# Altium PCB DSP大板子.PcbDoc (part 9 of 9)
Units mil, origin at the board's own origin, x right, y up, seen from the top; angles counter-clockwise.
Board outline 7874.02 x 9055.12 mil, 4 copper layers (Top Layer, GND02, PWR03, Bottom Layer), stack 23.756 mil thick; 656 components, 360 nets, 1967 pads, 2623 vias.
Unrouted connection lines stored in the file: 70.
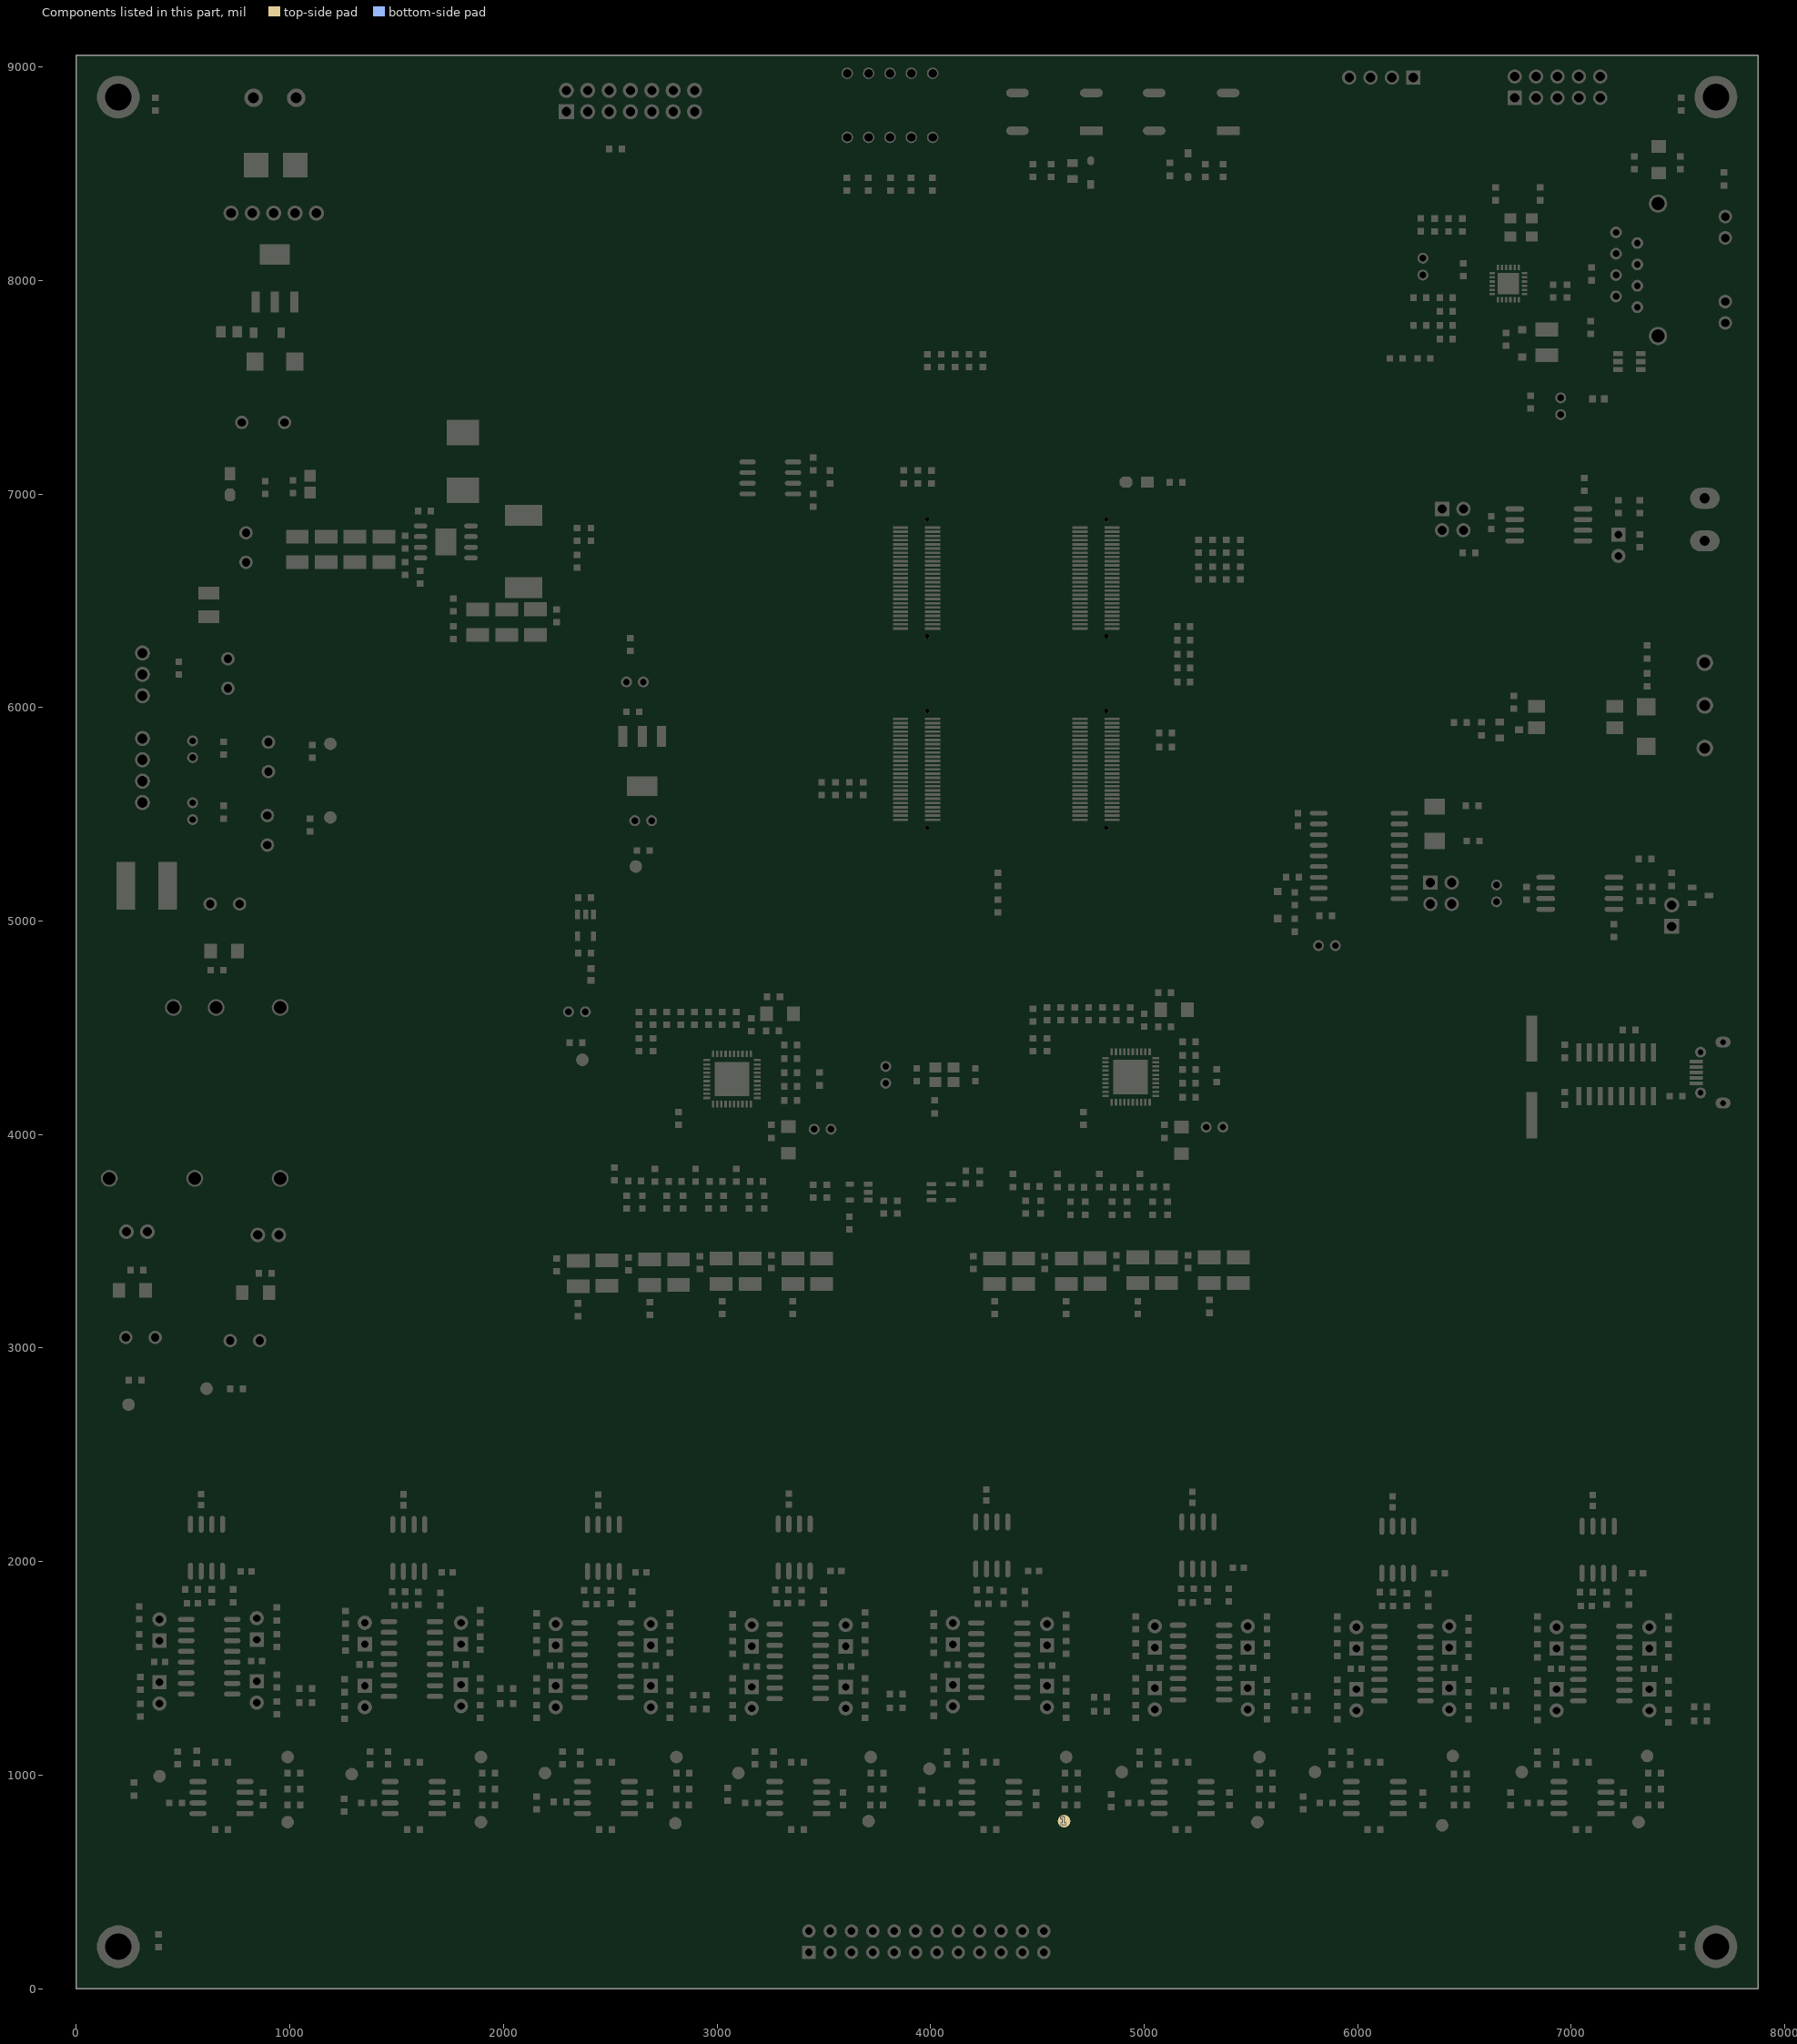
[diagram p8: the components of this part, seen from the top]

## Polygon pours and split planes (outlines as drawn) (continued)
IOVDD on PWR03 (split plane): 7853.92,8555.07 7145,8555.07 7142.06,8554.78 7139.23,8553.93 7136.63,8552.53 7134.34,8550.66 7132.47,8548.37 7131.07,8545.77 7130.22,8542.94 7129.93,8540 7129.93,7680 7130.22,7677.06 7131.07,7674.23 7132.47,7671.63 7134.34,7669.34 7136.63,7667.47 7139.23,7666.07 7142.06,7665.22 7145,7664.93 7853.92,7664.93 7853.92,3935.07 5751.24,3935.07 5285.66,4400.66 5283.37,4402.53 5280.77,4403.93 5277.94,4404.78 5275,4405.07 5271.24,4405.07 5270.66,4405.66 5268.37,4407.53 5265.77,4408.93 5262.94,4409.78 5260,4410.07 2050.07,4410.07 2050.07,5830 2049.78,5832.94 2048.93,5835.77 2047.53,5838.37 2045.66,5840.66 1590.66,6295.66 1588.37,6297.53 1585.77,6298.93 1582.94,6299.78 1580,6300.07 1380.07,6300.07 1380.07,6740 1379.78,6742.94 1378.93,6745.77 1377.53,6748.37 1375.66,6750.66 1210.07,6916.24 1210.07,9035.02 7853.92,9035.02
no net on PWR03 (split plane): 7853.92,7695.07 7160.07,7695.07 7160.07,8524.93 7853.92,8524.93
+5V_SYS on PWR03 (split plane): 7444.93,7143.76 7444.93,5861.24 6964.34,5380.66 6962.47,5378.37 6961.07,5375.77 6960.22,5372.94 6959.93,5370 6959.93,5076.24 6433.76,4550.07 5681.24,4550.07 4319.59,5911.72 4317.31,5913.6 4314.7,5914.99 4311.88,5915.85 4308.94,5916.14 2881.06,5916.14 2878.12,5915.85 2875.3,5914.99 2872.69,5913.6 2870.41,5911.72 2559.34,5600.66 2557.47,5598.37 2556.07,5595.77 2555.22,5592.94 2554.93,5590 2554.93,5015.07 2320.07,5015.07 2320.07,6650 2320.07,6763.76 2441.24,6884.93 2763.76,6884.93 2769.34,6879.34 2771.63,6877.47 2774.23,6876.07 2777.06,6875.22 2780,6874.93 3853.76,6874.93 5459.93,5268.76 5459.93,5145 5460.22,5142.06 5461.07,5139.23 5462.47,5136.63 5464.34,5134.34 5784.34,4814.34 5786.63,4812.47 5789.23,4811.07 5792.06,4810.22 5795,4809.93 6115,4809.93 6117.94,4810.22 6120.77,4811.07 6123.37,4812.47 6125.66,4814.34 6260.66,4949.34 6262.53,4951.63 6263.93,4954.23 6264.78,4957.06 6265.07,4960 6265.07,5263.76 7155.66,6154.34 7157.53,6156.63 7158.93,6159.23 7159.78,6162.06 7160.07,6165 7160.07,7073.76 7236.24,7149.93 7438.76,7149.93
VBIAS_1V5 on PWR03 (split plane): 485 vertices, not listed, extent 600.07,1190.07 7853.92,3724.93
AVDD on PWR03 (split plane): 5249.34,4379.34 5251.63,4377.47 5254.23,4376.07 5257.06,4375.22 5258.62,4375.06 5269.34,4364.34 5271.63,4362.47 5274.23,4361.07 5277.06,4360.22 5280,4359.93 5282.94,4360.22 5283.34,4360.34 5734.34,3909.34 5736.63,3907.47 5739.23,3906.07 5742.06,3905.22 5745,3904.93 7853.92,3904.93 7853.92,3465.07 5716.24,3465.07 5430.66,3750.66 5428.37,3752.53 5425.77,3753.93 5422.94,3754.78 5420,3755.07 2050.07,3755.07 2050.07,4379.93 5248.86,4379.93
-12V on PWR03 (split plane): 350 vertices, not listed, extent 470.07,1460.07 7604.93,6269.93
+12V on PWR03 (split plane): 243 vertices, not listed, extent 425.07,1010.07 7853.92,5969.93
+24V_SYS on PWR03 (split plane): 710,9034.93 1179.93,9034.93 1179.93,6910 1180.22,6907.06 1181.07,6904.23 1182.47,6901.63 1184.34,6899.34 1349.93,6733.76 1349.93,6300.07 635,6300.07 632.06,6299.78 629.23,6298.93 626.63,6297.53 624.34,6295.66 444.34,6115.66 442.47,6113.37 441.07,6110.77 440.22,6107.94 439.93,6105 439.93,5455 440.22,5452.06 441.07,5449.23 442.47,5446.63 444.34,5444.34 584.34,5304.34 586.63,5302.47 589.23,5301.07 592.06,5300.22 595,5299.93 1309.93,5299.93 1309.93,4720 1309.93,4685.07 20.1,4685.07 20.1,9035.02 709.05,9035.02
-15V on PWR03 (split plane): 1314.93,4100 1314.93,3725.07 940,3725.07 937.06,3724.78 934.23,3723.93 931.63,3722.53 929.34,3720.66 399.34,3190.66 397.47,3188.37 396.07,3185.77 395.22,3182.94 394.93,3180 394.93,1040 395.22,1037.06 396.07,1034.23 397.47,1031.63 399.34,1029.34 444.34,984.34 446.63,982.47 449.23,981.07 452.06,980.22 455,979.93 7853.92,979.93 7853.92,20.1 4300.07,20.1 4300.07,344.93 7240,344.93 7242.94,345.22 7245.77,346.07 7248.37,347.47 7250.66,349.34 7255.66,354.34 7257.53,356.63 7258.93,359.23 7259.78,362.06 7260.07,365 7260.07,770 7259.78,772.94 7258.93,775.77 7257.53,778.37 7255.66,780.66 7250.66,785.66 7248.37,787.53 7245.77,788.93 7242.94,789.78 7240,790.07 321.24,790.07 210.07,901.24 210.07,3758.76 626.24,4174.93 1314.93,4174.93
+15V on PWR03 (split plane): 1314.93,4347.5 1314.93,4205.07 620,4205.07 617.06,4204.78 614.23,4203.93 611.63,4202.53 609.34,4200.66 184.34,3775.66 182.47,3773.37 181.07,3770.77 180.22,3767.94 179.93,3765 179.93,895 180.22,892.06 181.07,889.23 182.47,886.63 184.34,884.34 304.34,764.34 306.63,762.47 309.23,761.07 312.06,760.22 315,759.93 7229.93,759.93 7229.93,375.07 4285,375.07 4282.06,374.78 4279.23,373.93 4276.63,372.53 4274.34,370.66 4272.47,368.37 4271.07,365.77 4270.22,362.94 4269.93,360 4269.93,20.1 20.1,20.1 20.1,4654.93 1314.93,4654.93
no net on GND02 (split plane): 7853.92,7695.07 7160.07,7695.07 7160.07,8524.93 7853.92,8524.93
PULSE_24V_GND on GND02 (split plane): 7853.92,5650.07 7201.24,5650.07 7115.07,5736.24 7115.07,6333.76 7231.24,6449.93 7853.92,6449.93
no net on GND02 (split plane): 7853.92,6480.07 7225,6480.07 7222.06,6479.78 7219.23,6478.93 7216.63,6477.53 7214.34,6475.66 7089.34,6350.66 7087.47,6348.37 7086.07,6345.77 7085.22,6342.94 7084.93,6340 7084.93,5730 7085.22,5727.06 7086.07,5724.23 7087.47,5721.63 7089.34,5719.34 7184.34,5624.34 7186.63,5622.47 7189.23,5621.07 7192.06,5620.22 7195,5619.93 7853.92,5619.93 7853.92,5485.07 7026.24,5485.07 6940.07,5571.24 6940.07,6413.76 6975.66,6449.34 7096.24,6569.93 7853.92,6569.93
GND on GND02 (split plane): 7853.92,8555.07 7145,8555.07 7142.06,8554.78 7139.23,8553.93 7136.63,8552.53 7134.34,8550.66 7132.47,8548.37 7131.07,8545.77 7130.22,8542.94 7129.93,8540 7129.93,7680 7130.22,7677.06 7131.07,7674.23 7132.47,7671.63 7134.34,7669.34 7136.63,7667.47 7139.23,7666.07 7142.06,7665.22 7145,7664.93 7853.92,7664.93 7853.92,6600.07 7090,6600.07 7087.06,6599.78 7084.23,6598.93 7081.63,6597.53 7079.34,6595.66 6954.34,6470.66 6914.34,6430.66 6912.47,6428.37 6911.07,6425.77 6910.22,6422.94 6909.93,6420 6909.93,5565 6910.22,5562.06 6911.07,5559.23 6912.47,5556.63 6914.34,5554.34 7009.34,5459.34 7011.63,5457.47 7014.23,5456.07 7017.06,5455.22 7020,5454.93 7853.92,5454.93 7853.92,20.1 20.1,20.1 20.1,9035.02 7853.92,9035.02

## Other copper
Top Layer:
  pour cut-out: 7145,8540 7805,8540 7874.02,8540 7874.02,7680 7805,7680 7145,7680
  pour cut-out: 3440,895 3440,850 3450,840 3545,840 3565,820 3750,820 3750,885 3735,900 3445,900
  pour cut-out: 1640,895 1640,845 1645,840 1740,840 1760,820 1920,820 1935,835 1935,895
  pour cut-out: 740,895 740,845 827.46,845 847.46,825 1025,825 1025,875 1005,895
  pour cut-out: 7070,2000 7119.99,2000 7120.23,2000.25 7125.12,2000.25 7125.12,1891.61 7134.49,1882.24 7134.49,1769.8 7073.59,1769.8 7070,1773.39
  pour cut-out: 7101.91,895 7101.91,853.09 7115,840 7210.3,840 7225.3,825 7385,825 7385,895
  pour cut-out: 6135,2000 6189.58,2000 6189.69,2000.11 6191.1,1998.7 6191.1,1767.33 6142.67,1767.33 6135,1775
  pour cut-out: 6140,895 6140,845 6245,845 6260,830 6475,830 6475,895
  pour cut-out: 5200,2020 5200.13,2019.87 5254.38,2019.87 5254.38,1905.39 5260.74,1899.03 5260.74,1779.34 5205.66,1779.34 5197.52,1787.48 5197.52,2017.52
  pour cut-out: 5230,895 5230,850 5235,845 5350,845 5375,820 5555,820 5570,835 5570,895
  pour cut-out: 4235,2020 4290,2020 4295,2015 4295,1905.22 4304.97,1895.24 4304.97,1774.97 4245.03,1774.97 4240,1780 4240,1910 4235,1915
  pour cut-out: 4340,895 4340,845 4450,845 4470,825 4650,825 4665,840 4665,890 4660,895
  pour cut-out: 3305,2010 3370,2010 3370,1794.4 3355,1779.4 3354.4,1780 3310,1780 3305,1785
  pour cut-out: 2415,2005 2470,2005 2475.88,1999.12 2475.88,1776.59 2416.59,1776.59 2415,1775 2410,1780 2410,2000
  pour cut-out: 2540,895 2540,845 2545,840 2650,840 2675,815 2830,815 2830,895
  pour cut-out: 1505,2010 1505.1,2009.91 1561.67,2009.91 1561.67,1893.36 1568.56,1886.48 1568.56,1766.83 1513.17,1766.83 1505,1775
  pour cut-out: 1640,895 1640,845 1645,840 1740,840 1760,820 1920,820 1935,835 1935,895
  pour cut-out: 560,2010 615,2010 620,2005 620,1910.12 607.44,1897.56 607.44,1782.6 547.4,1782.6 540,1790 540,1900 560,1920
  pour cut-out: 6910,6580 7875,6580 7875,5475 6910,5475
Bottom Layer:
  pour cut-out: 7145,8540 7805,8540 7874.02,8540 7874.02,7680 7805,7680 7145,7680
  pour cut-out: 2540,895 2540,845 2545,840 2650,840 2675,815 2830,815 2830,895
  pour cut-out: 3440,895 3440,850 3450,840 3545,840 3565,820 3750,820 3750,885 3735,900 3445,900
  pour cut-out: 4340,895 4340,845 4450,845 4470,825 4650,825 4665,840 4665,890 4660,895
  pour cut-out: 5230,895 5230,850 5235,845 5350,845 5375,820 5555,820 5570,835 5570,895
  pour cut-out: 6140,895 6140,845 6245,845 6260,830 6475,830 6475,895
  pour cut-out: 7101.91,895 7101.91,853.09 7115,840 7210.3,840 7225.3,825 7385,825 7385,895
  pour cut-out: 7070,2000 7119.99,2000 7120.23,2000.25 7125.12,2000.25 7125.12,1891.61 7134.49,1882.24 7134.49,1769.8 7073.59,1769.8 7070,1773.39
  pour cut-out: 6134.84,1999.84 6189.42,1999.84 6189.53,1999.95 6190.94,1998.54 6190.94,1767.17 6142.51,1767.17 6134.84,1774.84
  pour cut-out: 5200,2020 5200.13,2019.87 5254.38,2019.87 5254.38,1905.39 5260.74,1899.03 5260.74,1779.34 5205.66,1779.34 5197.52,1787.48 5197.52,2017.52
  pour cut-out: 4235,2019.73 4290,2019.73 4295,2014.73 4295,1904.94 4304.97,1894.97 4304.97,1774.7 4245.03,1774.7 4240,1779.73 4240,1909.73 4235,1914.73
  pour cut-out: 3305,2010 3370,2010 3370,1794.4 3355,1779.4 3354.4,1780 3310,1780 3305,1785
  pour cut-out: 2415,2005 2470,2005 2475.88,1999.12 2475.88,1776.59 2416.59,1776.59 2415,1775 2410,1780 2410,2000
  pour cut-out: 1505,2010 1505.1,2009.91 1561.67,2009.91 1561.67,1893.36 1568.56,1886.48 1568.56,1766.83 1513.17,1766.83 1505,1775
  pour cut-out: 1641.04,894.65 1641.04,844.65 1646.04,839.65 1741.04,839.65 1761.04,819.65 1921.04,819.65 1936.04,834.65 1936.04,894.65
  pour cut-out: 560,2010 615,2010 620,2005 620,1910.12 607.44,1897.56 607.44,1782.6 547.4,1782.6 540,1790 540,1900 560,1920
  pour cut-out: 740,895 740,845 827.46,845 847.46,825 1025,825 1025,875 1005,895
  pour cut-out: 6910,6580 6910,5475 7875,5475 7875,6580
GND02 (plane layer: these items are gaps in the copper):
  lines w30: 7870,5470 7020,5470 6925,5565 6925,6420 6965,6460 7090,6585 7875,6585 ; 7874.02,7680 7145,7680 7145,8540 7874.02,8540 ; 7875,5635 7195,5635 7100,5730 7100,6340 7225,6465 7865,6465 7875,6475
PWR03 (plane layer: these items are gaps in the copper):
  lines w30: -5,4670 1330,4670 ; 585,1920 710,1920 760,1870 760,1540 805,1495 880,1495 915,1530 915,1640 1040,1765 1190,1765 1200,1775 1200,2365 1330,2495 1565,2495 1670,2390 1670,1935 1725,1880 1725,1515 1760,1480 1860,1480 1900,1520 1900,1710 2060,1870 2060,2340 2215,2495 2525,2495 2580,2440 2580,1990 2630,1940 2630,1500 2650,1480 2745,1480 2790,1525 2790,1670 2965,1845 2965,2325 3165,2525 3380,2525 3475,2430 3475,1990 3525,1940 3525,1515 3550,1490 3665,1490 3695,1520 3695,1760 3905,1970 3905,2365 4095,2555 4300,2555 4420,2435 4420,1940 4480,1880 4480,1480 4510,1450 4620,1450 4645,1475 4645,1735 4835,1925 4835,2355 5005,2525 5250,2525 5370,2405 5370,1975 5415,1930 5415,1480 5450,1445 5505,1445 5570,1510 5570,1690 5780,1900 5780,2335 5930,2485 6215,2485 6325,2375 6325,1895 6350,1870 6350,1480 6375,1455 6485,1455 6525,1495 6525,1825 6760,2060 6760,2340 6920,2500 7155,2500 7255,2400 7255,1925 7295,1885 7295,1505 7335,1465 7435,1465 7450,1480 7450,1625 7620,1795 7620,2720 2290,2720 2035,2975 2035,5830 1580,6285 1360,6285 ; 710,9050 1195,9050 1195,6910 1365,6740 1365,6290 1360,6285 ; 1325,5315 595,5315 455,5455 455,6105 635,6285 1360,6285 ; 2030,4390 2035,4390 2040,4395 2325,4395 5230,4395 5260,4395 5280,4375 ; 2035,3740 5420,3740 5710,3450 7875,3450 ; 2435,2235 2435,2270 2405,2300 2250,2300 2225,2275 2225,1235 2185,1195 1575,1195 1525,1245 1525,2330 1375,2330 1345,2300 1345,1215 1340,1210 615,1210 585,1240 585,2185 585,2450 1560,3425 1695,3560 1695,5795 1610,5880 1505,5985 1360,5985 765,5985 765,5660 780,5645 1325,5645 1325,4720 1325,4675 1330,4670 ; 2435,2240 2435,1240 2490,1185 3065,1185 3135,1255 ; 3130,1255 3130,2225 3210,2305 3320,2305 3355,2270 3355,1235 3395,1195 3895,1195 4080,1195 4095,1210 4095,1340 4095,1345 4095,2295 4145,2345 4235,2345 4270,2310 4270,1215 4295,1190 4910,1190 5015,1295 5015,2240 5100,2325 5210,2325 5230,2305 5230,1225 5280,1175 5885,1175 5965,1255 5965,2215 ; 4285,0 4285,360 7240,360 7245,365 7245,770 7240,775 315,775 195,895 195,3765 620,4190 1330,4190 ; 5260,4390 5275,4390 5745,3920 7875,3920 ; 5965,2210 5965,2225 6065,2325 6165,2325 6205,2285 6205,2145 ; 6205,2150 6205,1195 6225,1175 6835,1175 6905,1245 6905,2260 ; 6905,2265 6905,2275 6970,2340 7095,2340 7095,2215 7095,1300 7220,1175 7870,1175 7870,1365 ; 7874.02,7680 7145,7680 7145,8540 7874.02,8540 ; 7875,995 6990,995 1525,995 455,995 410,1040 410,3180 940,3710 1330,3710 1330,4100 1330,4190 ; 1330,4190 1330,4347.5 1330,4670 ; 2305,5000 2570,5000 2570,5590 2881.06,5901.06 4308.94,5901.06 5675,4535 6440,4535 6975,5070 6975,5370 7460,5855 7460,7150 7445,7165 7230,7165 7145,7080 7145,6165 6250,5270 6250,4960 6115,4825 5795,4825 5475,5145 5475,5275 3860,6890 2780,6890 2770,6900 2435,6900 2305,6770 2305,6650 2305,5000

## Silkscreen, mask and mechanical layers (free items; w line width, h text height)
Mechanical 1:
  lines w10: 0,0 0,9055.12 7874.02,9055.12 7874.02,0 0,0 ; 78.74,78.74 78.74,8976.38 7795.28,8976.38 7795.28,78.74 78.74,78.74

## Text inside footprints (layer, text, board x,y; h text height)
BOOT1: Mechanical 9 "4" at 3976,8670 h20 r180; Mechanical 9 "1" at 3676,8670 h20 r180; Mechanical 9 "2" at 3776,8670 h20 r180; Mechanical 9 "3" at 3876,8670 h20 r180; Mechanical 9 "5" at 4076,8670 h20 r180; Mechanical 9 "6" at 4076,8970 h20 r180; Mechanical 9 "7" at 3976,8970 h20 r180; Mechanical 9 "8" at 3876,8970 h20 r180; Mechanical 9 "9" at 3776,8970 h20 r180; Mechanical 9 "10" at 3692,8970 h20 r180
C112: Top Overlay "+" at 819.21,3570 h39.37; Top Overlay "-" at 939.21,3565 h39.37
C123: Top Overlay "+" at 364.21,3505 h39.37 r180; Top Overlay "-" at 244.21,3510 h39.37 r180
J2: Top Overlay "23" at 4742,142 h40; Top Overlay "24" at 4742,242 h40; Top Overlay "1" at 3180,150 h40; Top Overlay "2" at 3170,250 h40